# Altium PCB VCB2025_rev0.PcbDoc (part 3 of 3)
Units mm, origin at the board's own origin, x right, y up, seen from the top; angles counter-clockwise.
Board outline 146 x 96 mm, 2 copper layers (Top Layer, Bottom Layer); 173 components, 126 nets, 592 pads, 876 vias.
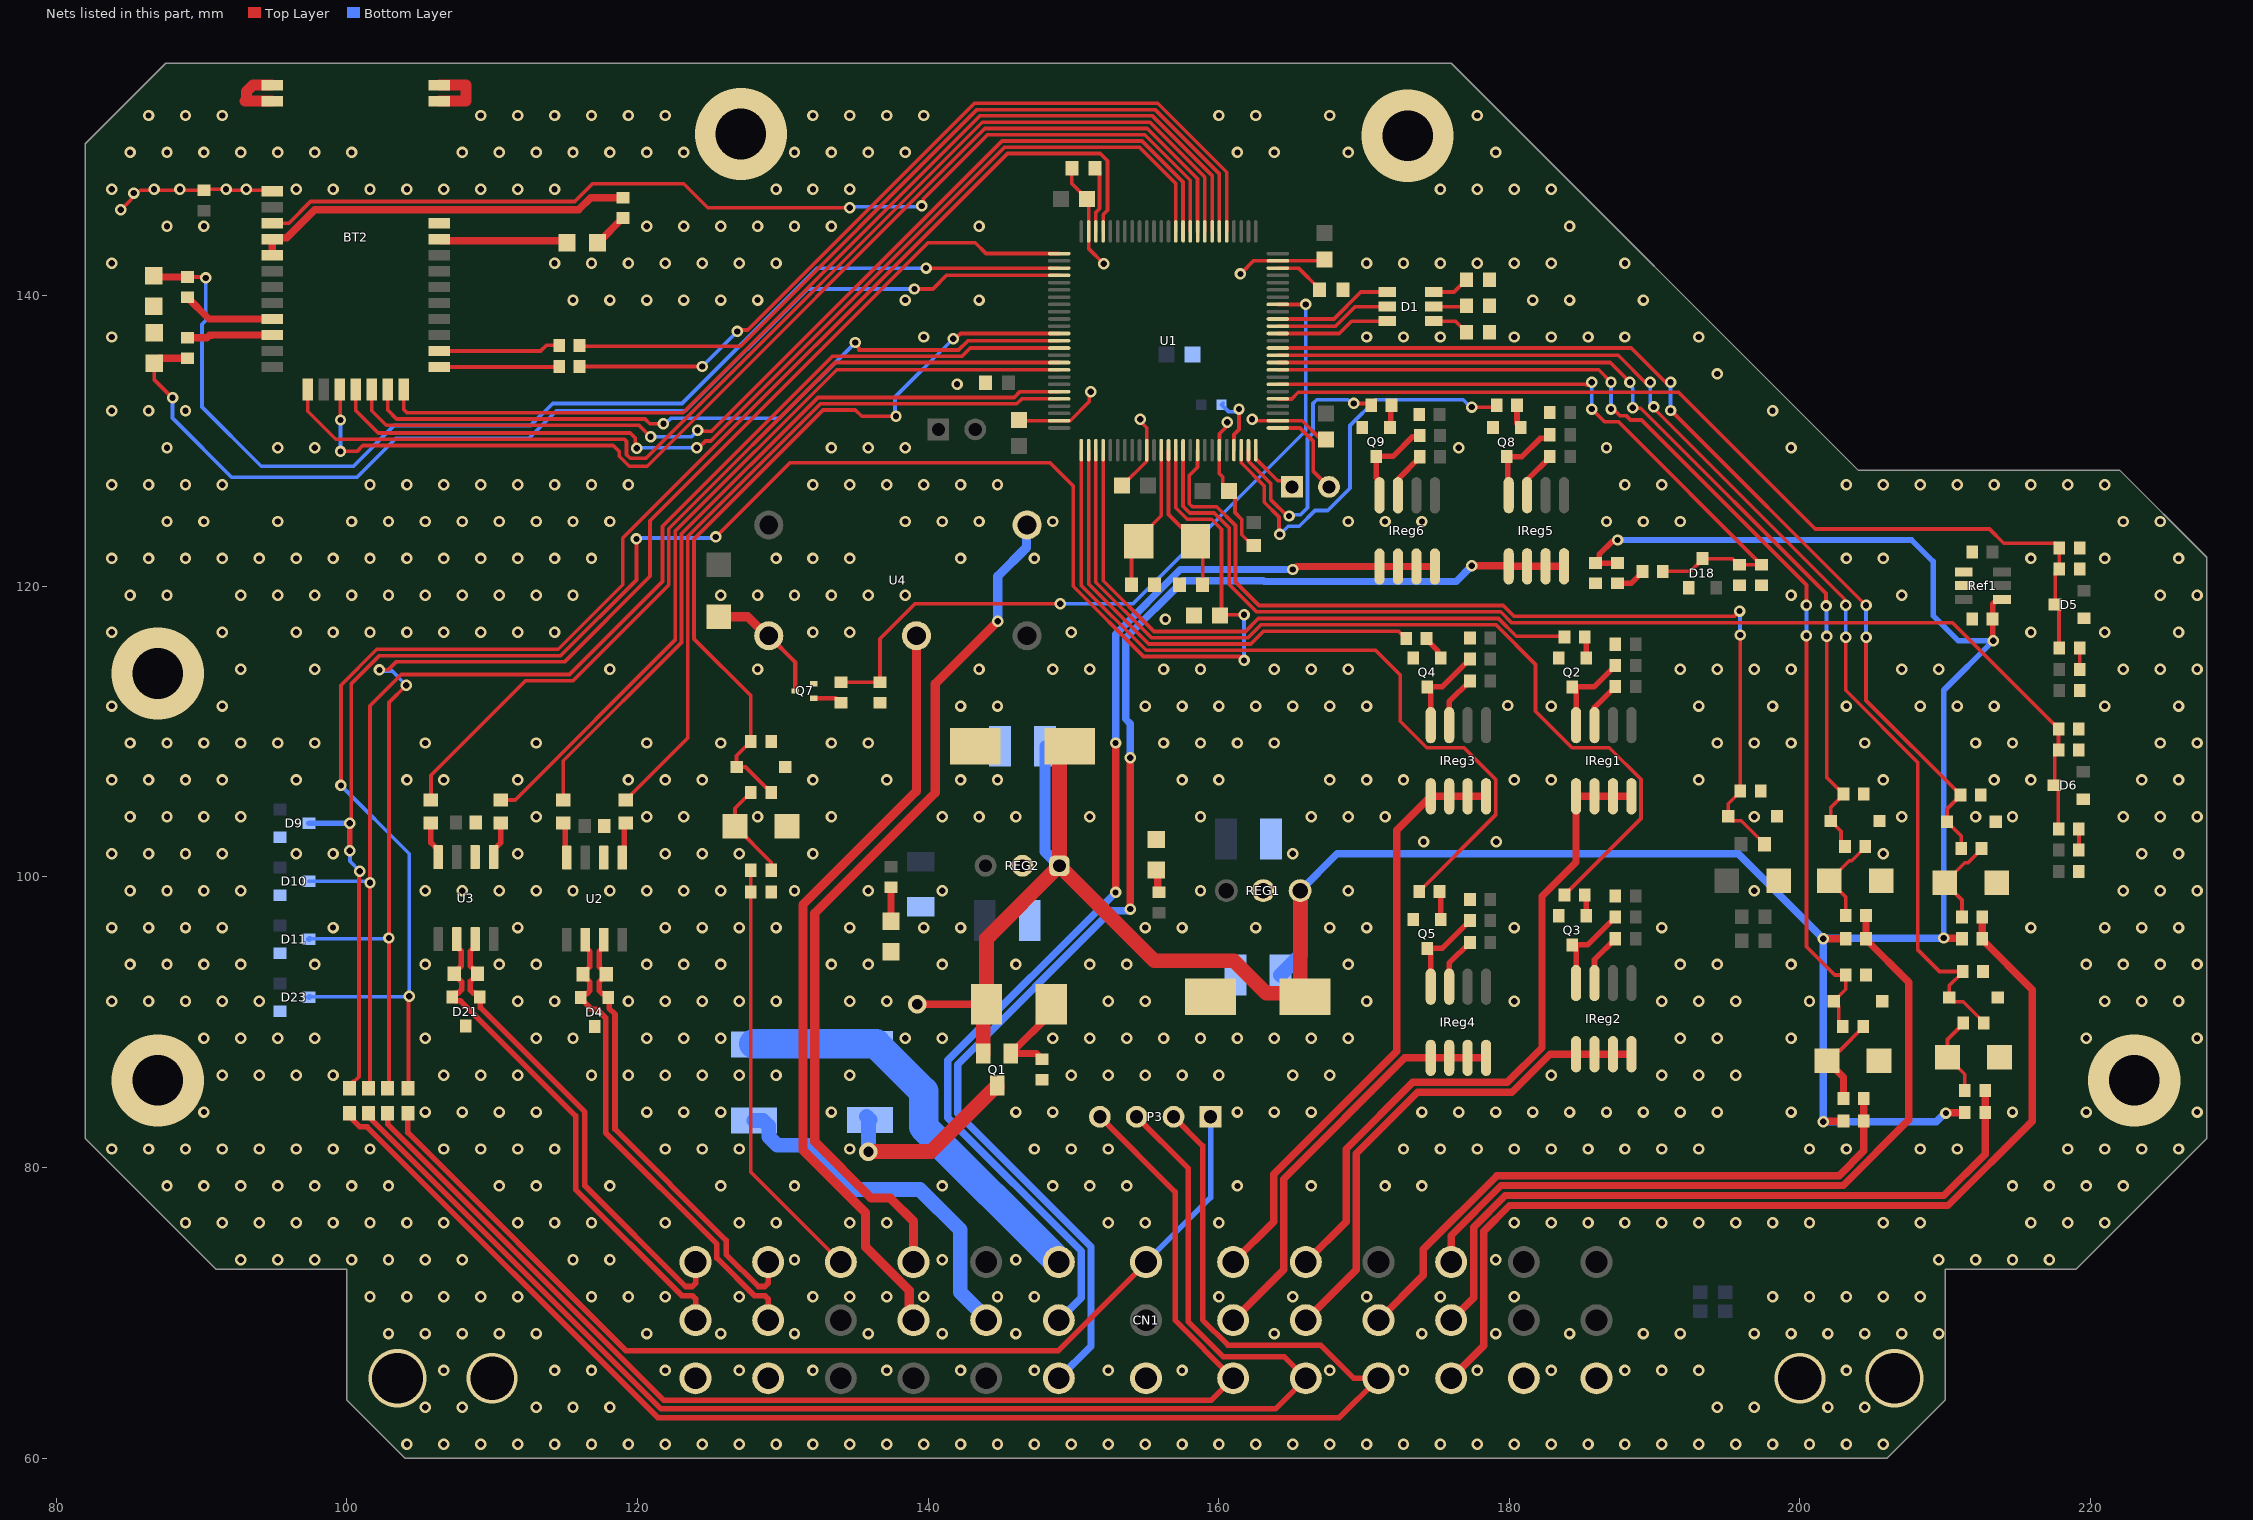
[diagram p2: the nets of this part, all layers, seen from the top]

## Via types
v1: diameter 0.787, hole 0.432, Top Layer to Bottom Layer, 855 vias
v2: diameter 1.27, hole 0.711, Top Layer to Bottom Layer, 10 vias
v3: diameter 6.35, hole 3.48, Top Layer to Bottom Layer, 5 vias
v4: diameter 4, hole 3.5, Top Layer to Bottom Layer, 2 vias
v5: diameter 3.5, hole 3, Top Layer to Bottom Layer, 2 vias
v6: diameter 1.5, hole 1, Top Layer to Bottom Layer, 2 vias

## Nets (pads, with @x,y where several pads share a name; then routed paths per layer and width w, separated by ;. In a path a pad name is that pad's centre, name@x,y a point inside that pad or via, vN(x,y) a via of type N, cw(c..) or ccw(c..) an arc to the next point about the centre after c; other vN are vias at no path point) (continued)
"BT EAN": BT2.20 U1.88 | length 51
  Top Layer w0.254: BT2.20@102.819,133.542 102.819,132.131 103.429,131.521 120.523,131.521 120.853,131.191 v1(121.793,131.191) ; v1(135.001,136.779) 135.001,136.635 135.255,136.381 135.255,136.264 142.106,136.264 142.742,136.9 U1.88@149.025,136.9
  Bottom Layer w0.254: v1(121.793,131.191) 121.937,131.191 122.318,131.572 125.349,131.572 129.794,131.572 v1(135.001,136.779)
"BT NCTS": BT2.15 U1.58 | length 80
  Top Layer w0.254: BT2.15@97.32,133.542 97.32,132.042 99.238,130.124 119.104,130.124 119.253,129.975 119.253,129.06 119.507,128.806 120.596,128.806 143.732,151.943 155.268,151.943 159.05,148.161 U1.58@159.05,144.425
"BT NRTS": BT2.17 U1.59 | length 78.9
  Top Layer w0.254: BT2.17@99.52,133.542 99.544,133.518 99.544,131.469 v1(99.568,131.445) ; v1(99.568,129.286) 100.698,129.286 101.105,129.692 103.505,129.692 118.339,129.692 118.745,129.286 118.745,128.958 119.433,128.27 120.67,128.27 143.911,151.511 155.089,151.511 158.55,148.05 U1.59@158.55,144.425
  Bottom Layer w0.254: v1(99.568,129.286) v1(99.568,131.445)
"BT P2_0": BT2.18 U1.62 | length 72.2
  Top Layer w0.254: BT2.18@100.62,133.542 100.62,132.102 102.165,130.556 119.507,130.556 119.85,130.213 119.85,129.607 v1(119.952,129.505) ; v1(124.079,129.54) 124.223,129.54 124.685,130.001 125.048,130.001 145.263,150.216 154.552,150.216 157.05,147.718 U1.62@157.05,144.425
  Bottom Layer w0.254: v1(119.952,129.505) 119.974,129.527 124.066,129.527 v1(124.079,129.54)
"BT P2_4": BT2.19 U1.61 | length 71.1
  Top Layer w0.254: BT2.19@101.719,133.542 101.719,132.088 102.718,131.089 120.117,131.089 v1(120.904,130.302) ; v1(124.138,130.751) 124.206,130.683 125.119,130.683 145.084,150.647 154.731,150.647 157.55,147.829 U1.61@157.55,144.425
  Bottom Layer w0.254: v1(120.904,130.302) 123.723,130.302 124.138,130.717 v1(124.138,130.751)
"BT Reset": BT2.21 U1.57 | length 71.1
  Top Layer w0.254: BT2.21@103.919,133.542 103.919,132.174 104.14,131.953 123.132,131.953 143.553,152.375 155.447,152.375 159.55,148.271 U1.57@159.55,144.425
"BT Rx": BT2.22 R33.1 | length 8.3
  Top Layer w0.254: BT2.22@106.37,135.095 114.583,135.095 R33.1@114.616,135.128
"BT Tx": BT2.23 R32.1 | length 8.4
  Top Layer w0.254: BT2.23@106.37,136.195 113.335,136.195 113.722,136.582 R32.1@114.616,136.582
"CAN Rx": R9.2 U1.95 | length 51.7
  Top Layer w0.254: R9.2@114.9,105.3 114.9,108 123.036,116.136 123.036,123.615 132.421,133 145.931,133 146.331,133.4 U1.95@149.025,133.4
"CAN Tx": R10.2 U1.96 | length 49.4
  Top Layer w0.254: R10.2@119.209,105.3 119.259,105.3 119.582,105.623 119.582,105.673 123.468,109.56 123.468,123.437 132.6,132.568 146.11,132.568 146.442,132.9 U1.96@149.025,132.9
CAN_N: CN1.35 D4.2 R11.1 U2.6 | length 33.1
  Top Layer w0.381: U2.6@116.419,95.679 116.419,95.179 116.737,94.862 116.737,93.832 116.254,93.35 R11.1@116.254,93.3 116.254,93.25 116.737,92.767 116.737,92.178 116.514,91.955 116.314,91.955 116.104,91.746 116.104,91.646 116.855,90.895 117.226,90.895 117.823,90.298 117.823,82.379 125.468,74.734 125.468,73.77 128.056,71.183 128.777,71.183 129,70.959 CN1.35@129,69.5
CAN_P: CN1.34 D4.1 R11.2 U2.7 | length 31.4
  Top Layer w0.381: U2.7@117.772,95.597 U2.7@117.689,95.679 117.689,95.179 117.372,94.862 117.372,93.832 117.854,93.35 R11.2@117.854,93.3 117.854,93.25 117.372,92.768 117.372,92.178 117.595,91.955 117.795,91.955 118.004,91.746 D4.1@118.004,91.696 118.056,91.644 118.056,90.963 118.458,90.561 118.458,82.642 126.103,74.997 126.103,74.033 128.319,71.818 128.777,71.818 129,72.041 CN1.34@129,73.5
"Debug LED B": D1.6 U1.39 | length 7.9
  Top Layer w0.254: U1.39@164.075,137.4 168.3,137.4 169.15,138.25 D1.6@171.6,138.25
"Debug LED G": D1.5 U1.40 | length 8.1
  Top Layer w0.254: U1.40@164.075,137.9 168.042,137.9 169.392,139.25 D1.5@171.6,139.25
"Debug LED R": D1.4 U1.41 | length 8.3
  Top Layer w0.254: U1.41@164.075,138.4 167.931,138.4 169.781,140.25 D1.4@171.6,140.25
"GLV Power In": CN1.22 F8.1 F12.1 | length 28.6
  Bottom Layer w2.032: F12.1@128.016,88.515 132.08,88.515 F8.1@136,88.515 136.433,88.515 139.7,85.248 139.7,82.8 CN1.22@149,73.5
GND: BT2.1 BT2.2 BT2.3 BT2.31 BT2.32 BT2.33 C1.1 C2.1 C3.1 C4.1 C5.1 C6.1 C7.1 C8.1 C9.1 C10.1 C11.1 C12.2 C13.1 C14.1 C15.1 C16.2 C17.1 C18.1 C19.1 C20.1 C21.1 C22.1 C23.1 C24.1 C25.1 C26.1 C27.1 C28.1 C30.1 C31.1 C32.1 C33.1 C34.1 C35.1 C36.1 C37.1 C38.1 C39.1 C40.1 CN1.3 CN1.6 CN1.21 CN1.36 CN1.39 D3.1 D4.3 D5.1 D6.1 D7.1 D8.1 D9.1 D10.1 D11.1 D12.1 D13.1 D14.1 D15.1 D16.1 D17.1 D18.1 D19.1 D20.1 D21.3 D22.1 D23.1 DS1.2 DS2.2 DS4.2 DS5.2 Q2.2 Q3.2 Q4.2 Q5.2 Q7.2 Q8.2 Q9.2 R1.2 R2.2 R3.2 R4.2 R5.1 R8.1 R14.1 R15.1 R18.1 R19.1 R42.1 R45.1 R46.1 R62.1 Ref1.1 Ref1.2 REG1.2 REG2.2 U1.10 U1.20 U1.27 U1.49 U1.74 U1.99 U2.2 U3.2 | length 61.1
  Top Layer w0.254: v1(84.455,145.923) 85.79,147.258 C28.1@90.17,147.258 90.232,147.32 v1(91.694,147.32) 91.757,147.256 94.805,147.256 BT2.3@94.869,147.193 ; C9.1@146.25,131.45 146.3,131.4 U1.99@149.025,131.4 149.027,131.402 149.785,131.402 151.098,132.715 151.098,133.298 v1(151.2,133.4) ; C2.1@149.9,148.759 149.9,147.704 C25.1@150.95,146.654 151.05,146.554 U1.74@151.05,144.425 151.05,143.25 v1(152.1,142.2) ; C6.1@153.35,126.95 153.383,126.95 155.048,128.615 155.048,129.373 U1.10@155.05,129.375 155.05,130.906 154.6,131.356 v1(154.6,131.5) ; v1(160.6,131.3) 160.6,131.056 160.052,130.508 160.052,129.377 U1.20@160.05,129.375 160.05,127.75 160.277,127.523 160.277,126.973 C7.1@160.7,126.55 161.123,126.127 161.123,125.077 161.595,124.605 161.595,123.555 162.35,122.8 C3.1@162.4,122.8 ; v1(161.5,141.5) 162.4,142.4 U1.49@164.075,142.4 167.196,142.4 C23.1@167.3,142.504 ; v1(162.3,131.5) 162.398,131.402 164.073,131.402 U1.27@164.075,131.4 165.75,131.4 167.05,130.1 C8.1@167.4,130.1
  Top Layer w0.381: C36.1@177.277,116.477 C36.1@177.3,116.454
  Top Layer w0.762: BT2.2@94.869,153.393 92.987,153.393 93.091,153.497 93.091,154.047 93.537,154.493 BT2.1@94.869,154.493 ; BT2.32@106.37,153.393 108.181,153.393 108.204,153.416 108.204,154.493 BT2.33@106.37,154.493
  other v1: 104.14,60.96 106.68,60.96 109.22,60.96 111.76,60.96 114.3,60.96 116.84,60.96 119.38,60.96 121.92,60.96 124.46,60.96 127,60.96 129.54,60.96 132.08,60.96 134.62,60.96 137.16,60.96 139.7,60.96 142.24,60.96 144.78,60.96 147.32,60.96 149.86,60.96 152.4,60.96 154.94,60.96 157.48,60.96 160.02,60.96 162.56,60.96 165.1,60.96 167.64,60.96 170.18,60.96 172.72,60.96 175.26,60.96 177.8,60.96 180.34,60.96 182.88,60.96 185.42,60.96 187.96,60.96 190.5,60.96 193.04,60.96 195.58,60.96 198.12,60.96 200.66,60.96 203.2,60.96 205.74,60.96 105.41,63.5 107.95,63.5 113.03,63.5 115.57,63.5 118.11,63.5 194.31,63.5 196.85,63.5 201.93,63.5 204.47,63.5 106.68,66.04 114.3,66.04 116.84,66.04 121.92,66.04 127,66.04 132.08,66.04 137.16,66.04 142.24,66.04 147.32,66.04 152.4,66.04 157.48,66.04 167.64,66.04 172.72,66.04 177.8,66.04 182.88,66.04 187.96,66.04 190.5,66.04 193.04,66.04 203.2,66.04 102.87,68.58 105.41,68.58 107.95,68.58 110.49,68.58 113.03,68.58 120.65,68.58 125.73,68.58 130.81,68.58 135.89,68.58 140.97,68.58 146.05,68.58 163.83,68.58 173.99,68.58 179.07,68.58 184.15,68.58 189.23,68.58 191.77,68.58 196.85,68.58 199.39,68.58 201.93,68.58 204.47,68.58 207.01,68.58 209.55,68.58 101.6,71.12 104.14,71.12 106.68,71.12 109.22,71.12 111.76,71.12 116.84,71.12 119.38,71.12 121.92,71.12 127,71.12 132.08,71.12 134.62,71.12 137.16,71.12 139.7,71.12 144.78,71.12 147.32,71.12 160.02,71.12 165.1,71.12 170.18,71.12 175.26,71.12 180.34,71.12 198.12,71.12 200.66,71.12 203.2,71.12 205.74,71.12 208.28,71.12 92.71,73.66 95.25,73.66 97.79,73.66 100.33,73.66 102.87,73.66 105.41,73.66 107.95,73.66 115.57,73.66 118.11,73.66 130.81,73.66 140.97,73.66 146.05,73.66 179.07,73.66 209.55,73.66 212.09,73.66 214.63,73.66 217.17,73.66 88.9,76.2 91.44,76.2 93.98,76.2 96.52,76.2 99.06,76.2 101.6,76.2 104.14,76.2 106.68,76.2 111.76,76.2 114.3,76.2 116.84,76.2 121.92,76.2 127,76.2 129.54,76.2 134.62,76.2 137.16,76.2 152.4,76.2 154.94,76.2 160.02,76.2 180.34,76.2 182.88,76.2 185.42,76.2 187.96,76.2 190.5,76.2 193.04,76.2 195.58,76.2 198.12,76.2 200.66,76.2 205.74,76.2 208.28,76.2 215.9,76.2 218.44,76.2 220.98,76.2 87.63,78.74 90.17,78.74 92.71,78.74 95.25,78.74 97.79,78.74 100.33,78.74 102.87,78.74 110.49,78.74 113.03,78.74 118.11,78.74 125.73,78.74 130.81,78.74 140.97,78.74 148.59,78.74 151.13,78.74 153.67,78.74 161.29,78.74 166.37,78.74 171.45,78.74 173.99,78.74 214.63,78.74 217.17,78.74 219.71,78.74 222.25,78.74 83.82,81.28 86.36,81.28 88.9,81.28 91.44,81.28 93.98,81.28 96.52,81.28 99.06,81.28 101.6,81.28 106.68,81.28 109.22,81.28 111.76,81.28 114.3,81.28 121.92,81.28 124.46,81.28 127,81.28 134.62,81.28 147.32,81.28 149.86,81.28 152.4,81.28 172.72,81.28 175.26,81.28 177.8,81.28 180.34,81.28 182.88,81.28 185.42,81.28 187.96,81.28 190.5,81.28 193.04,81.28 200.66,81.28 203.2,81.28 208.28,81.28 210.82,81.28 218.44,81.28 220.98,81.28 223.52,81.28 226.06,81.28 90.17,83.82 105.41,83.82 107.95,83.82 110.49,83.82 113.03,83.82 120.65,83.82 123.19,83.82 125.73,83.82 133.35,83.82 146.05,83.82 148.59,83.82 161.29,83.82 163.83,83.82 166.37,83.82 173.99,83.82 176.53,83.82 179.07,83.82 181.61,83.82 184.15,83.82 186.69,83.82 189.23,83.82 191.77,83.82 194.31,83.82 199.39,83.82 214.63,83.82 219.71,83.82 227.33,83.82 91.44,86.36 93.98,86.36 96.52,86.36 99.06,86.36 106.68,86.36 109.22,86.36 111.76,86.36 116.84,86.36 119.38,86.36 121.92,86.36 124.46,86.36 127,86.36 129.54,86.36 134.62,86.36 149.86,86.36 152.4,86.36 154.94,86.36 157.48,86.36 160.02,86.36 165.1,86.36 167.64,86.36 182.88,86.36 190.5,86.36 193.04,86.36 195.58,86.36 90.17,88.9 92.71,88.9 95.25,88.9 97.79,88.9 105.41,88.9 113.03,88.9 115.57,88.9 120.65,88.9 123.19,88.9 125.73,88.9 138.43,88.9 140.97,88.9 148.59,88.9 151.13,88.9 153.67,88.9 156.21,88.9 158.75,88.9 161.29,88.9 163.83,88.9 166.37,88.9 168.91,88.9 191.77,88.9 194.31,88.9 199.39,88.9 219.71,88.9 227.33,88.9 83.82,91.44 86.36,91.44 88.9,91.44 91.44,91.44 93.98,91.44 111.76,91.44 114.3,91.44 119.38,91.44 121.92,91.44 124.46,91.44 127,91.44 129.54,91.44 134.62,91.44 137.16,91.44 152.4,91.44 154.94,91.44 170.18,91.44 180.34,91.44 190.5,91.44 193.04,91.44 195.58,91.44 200.66,91.44 220.98,91.44 223.52,91.44 226.06,91.44 85.09,93.98 87.63,93.98 90.17,93.98 92.71,93.98 97.79,93.98 105.41,93.98 110.49,93.98 113.03,93.98 120.65,93.98 123.19,93.98 125.73,93.98 133.35,93.98 135.89,93.98 140.97,93.98 146.05,93.98 151.13,93.98 153.67,93.98 168.91,93.98 191.77,93.98 194.31,93.98 199.39,93.98 219.71,93.98 222.25,93.98 224.79,93.98 227.33,93.98 83.82,96.52 86.36,96.52 88.9,96.52 91.44,96.52 99.06,96.52 111.76,96.52 121.92,96.52 124.46,96.52 127,96.52 129.54,96.52 134.62,96.52 139.7,96.52 142.24,96.52 154.94,96.52 157.48,96.52 162.56,96.52 167.64,96.52 170.18,96.52 180.34,96.52 190.5,96.52 215.9,96.52 220.98,96.52 223.52,96.52 226.06,96.52 85.09,99.06 87.63,99.06 90.17,99.06 92.71,99.06 105.41,99.06 107.95,99.06 110.49,99.06 113.03,99.06 115.57,99.06 118.11,99.06 120.65,99.06 123.19,99.06 125.73,99.06 130.81,99.06 135.89,99.06 140.97,99.06 158.75,99.06 168.91,99.06 196.85,99.06 222.25,99.06 224.79,99.06 227.33,99.06 83.82,101.6 86.36,101.6 88.9,101.6 91.44,101.6 96.52,101.6 99.06,101.6 111.76,101.6 121.92,101.6 124.46,101.6 127,101.6 132.08,101.6 165.1,101.6 205.74,101.6 223.52,101.6 226.06,101.6 174.1,102.425 179.1,102.425 85.09,104.14 87.63,104.14 90.17,104.14 92.71,104.14 113.03,104.14 120.65,104.14 123.19,104.14 128.27,104.14 133.35,104.14 140.97,104.14 143.51,104.14 146.05,104.14 151.13,104.14 158.75,104.14 166.37,104.14 168.91,104.14 171.45,104.14 196.85,104.14 207.01,104.14 212.09,104.14 214.63,104.14 222.25,104.14 224.79,104.14 227.33,104.14 83.82,106.68 86.36,106.68 88.9,106.68 91.44,106.68 96.52,106.68 104.14,106.68 106.68,106.68 111.76,106.68 119.38,106.68 121.92,106.68 124.46,106.68 132.08,106.68 137.16,106.68 142.24,106.68 144.78,106.68 157.48,106.68 160.02,106.68 167.64,106.68 170.18,106.68 172.72,106.68 180.34,106.68 182.88,106.68 193.04,106.68 205.74,106.68 213.36,106.68 215.9,106.68 223.52,106.68 226.06,106.68 85.09,109.22 87.63,109.22 90.17,109.22 92.71,109.22 95.25,109.22 97.79,109.22 105.41,109.22 113.03,109.22 120.65,109.22 125.73,109.22 133.35,109.22 135.89,109.22 156.21,109.22 158.75,109.22 161.29,109.22 163.83,109.22 194.31,109.22 196.85,109.22 199.39,109.22 204.47,109.22 212.09,109.22 214.63,109.22 224.79,109.22 227.33,109.22 83.82,111.76 91.44,111.76 142.24,111.76 144.78,111.76 154.94,111.76 157.48,111.76 160.02,111.76 162.56,111.76 165.1,111.76 167.64,111.76 170.18,111.76 182.88,111.76 193.04,111.76 198.12,111.76 203.2,111.76 208.28,111.76 210.82,111.76 213.36,111.76 220.98,111.76 226.06,111.76 179.9,111.8 92.71,114.3 97.79,114.3 118.11,114.3 128.27,114.3 143.51,114.3 148.59,114.3 151.13,114.3 156.21,114.3 158.75,114.3 163.83,114.3 166.37,114.3 168.91,114.3 191.77,114.3 194.31,114.3 196.85,114.3 199.39,114.3 207.01,114.3 209.55,114.3 222.25,114.3 224.79,114.3 227.33,114.3 83.82,116.84 91.44,116.84 96.52,116.84 99.06,116.84 101.6,116.84 104.14,116.84 106.68,116.84 109.22,116.84 111.76,116.84 114.3,116.84 132.08,116.84 134.62,116.84 149.86,116.84 215.9,116.84 220.98,116.84 226.06,116.84 156.337,117.729 85.09,119.38 87.63,119.38 92.71,119.38 95.25,119.38 97.79,119.38 100.33,119.38 102.87,119.38 105.41,119.38 107.95,119.38 110.49,119.38 113.03,119.38 115.57,119.38 125.73,119.38 128.27,119.38 130.81,119.38 133.35,119.38 135.89,119.38 138.43,119.38 199.39,119.38 207.01,119.38 224.79,119.38 227.33,119.38 83.82,121.92 86.36,121.92 88.9,121.92 91.44,121.92 93.98,121.92 96.52,121.92 99.06,121.92 101.6,121.92 104.14,121.92 106.68,121.92 109.22,121.92 111.76,121.92 114.3,121.92 116.84,121.92 129.54,121.92 132.08,121.92 134.62,121.92 142.24,121.92 147.32,121.92 203.2,121.92 205.74,121.92 215.9,121.92 220.98,121.92 226.06,121.92 87.63,124.46 90.17,124.46 95.25,124.46 100.33,124.46 102.87,124.46 105.41,124.46 107.95,124.46 110.49,124.46 113.03,124.46 115.57,124.46 118.11,124.46 138.43,124.46 140.97,124.46 143.51,124.46 148.59,124.46 168.91,124.46 171.45,124.46 173.99,124.46 186.69,124.46 189.23,124.46 191.77,124.46 222.25,124.46 224.79,124.46 83.82,127 86.36,127 88.9,127 91.44,127 101.6,127 104.14,127 106.68,127 109.22,127 111.76,127 114.3,127 116.84,127 119.38,127 132.08,127 134.62,127 137.16,127 139.7,127 142.24,127 144.78,127 187.96,127 190.5,127 203.2,127 205.74,127 208.28,127 210.82,127 213.36,127 215.9,127 218.44,127 220.98,127 87.63,129.54 95.25,129.54 97.79,129.54 133.35,129.54 135.89,129.54 138.43,129.54 176.53,129.54 186.69,129.54 199.39,129.54 83.82,132.08 86.36,132.08 88.9,132.08 198.12,132.08 142,133.9 194.31,134.62 83.82,137.16 139.7,137.16 170.18,137.16 172.72,137.16 175.26,137.16 180.34,137.16 182.88,137.16 185.42,137.16 187.96,137.16 193.04,137.16 115.57,139.7 118.11,139.7 120.65,139.7 123.19,139.7 125.73,139.7 128.27,139.7 138.43,139.7 143.51,139.7 181.61,139.7 184.15,139.7 189.23,139.7 83.82,142.24 114.3,142.24 116.84,142.24 119.38,142.24 121.92,142.24 124.46,142.24 127,142.24 129.54,142.24 170.18,142.24 172.72,142.24 175.26,142.24 177.8,142.24 180.34,142.24 182.88,142.24 187.96,142.24 87.63,144.78 90.17,144.78 120.65,144.78 123.19,144.78 125.73,144.78 128.27,144.78 130.81,144.78 133.35,144.78 143.51,144.78 184.15,144.78 85.344,147.066 83.82,147.32 86.741,147.32 88.519,147.32 93.091,147.32 96.52,147.32 99.06,147.32 101.6,147.32 104.14,147.32 106.68,147.32 109.22,147.32 111.76,147.32 114.3,147.32 129.54,147.32 132.08,147.32 134.62,147.32 175.26,147.32 177.8,147.32 180.34,147.32 182.88,147.32 85.09,149.86 87.63,149.86 90.17,149.86 92.71,149.86 95.25,149.86 97.79,149.86 100.33,149.86 107.95,149.86 110.49,149.86 113.03,149.86 115.57,149.86 118.11,149.86 120.65,149.86 123.19,149.86 130.81,149.86 133.35,149.86 135.89,149.86 138.43,149.86 161.29,149.86 163.83,149.86 168.91,149.86 179.07,149.86 86.36,152.4 88.9,152.4 91.44,152.4 109.22,152.4 111.76,152.4 114.3,152.4 116.84,152.4 119.38,152.4 121.92,152.4 132.08,152.4 134.62,152.4 137.16,152.4 139.7,152.4 160.02,152.4 162.56,152.4 167.64,152.4 177.8,152.4
  other v3: 87,86 223,86 87,114 173,151 127.127,151.13
  other v4: 103.5,65.5 206.5,65.5
  other v5: 110,65.5 200,65.5
"Internal Connect": BT2.6 BT2.7 R69.1 | length 26.4
  Top Layer w0.508: BT2.7@94.869,142.794 BT2.6@94.869,143.894 94.971,143.995 95.862,143.995 97.79,145.923 115.951,145.923 116.778,146.75 R69.1@118.999,146.75
"Launch Control": CN1.9 R31.1 R34.1 | length 67.4
  Top Layer w0.508: CN1.9@176,65.5 178.236,67.736 178.236,75.616 180.012,77.393 210.193,77.393 216,83.2 216,92.25 212.55,95.7 R31.1@212.55,95.75 R34.1@212.55,97.25
"Launch Control Interm": D19.2 R34.2 R35.1 | length 6.4
  Top Layer w0.254: D19.2@209.96,99.6 D19.2@209.97,99.6 ; R34.2@211.15,97.25 211.15,98.42 D19.2@209.97,99.6 ; R35.1@212.5,101.95 212.5,101.9 211.57,100.97 211.34,100.97 D19.2@209.97,99.6
"LC LED": R65.2 U1.23 | length 28.5
  Top Layer w0.254: U1.23@161.55,129.375 161.552,129.373 161.552,128.505 163.144,126.912 163.144,125.781 164.147,124.777 164.147,123.634 v1(164.211,123.571) ; v1(177.419,132.334) 179.005,132.334 R65.2@179.132,132.461
  Bottom Layer w0.254: v1(164.211,123.571) 164.782,124.142 165.544,124.142 166.624,125.222 167.513,125.222 169.037,126.746 169.037,131.064 170.815,132.842 176.831,132.842 177.339,132.334 v1(177.419,132.334)
"LC LED Output": CN1.24 IReg5.5 IReg5.6 IReg5.7 IReg5.8 | length 93.7
  Top Layer w0.508: v1(153.924,97.79) v1(153.924,108.204) ; v1(177.419,121.412) 179.922,121.412 IReg5.5@179.959,121.375 IReg5.6@181.229,121.375 IReg5.7@182.499,121.375 IReg5.8@183.769,121.375
  Bottom Layer w0.508: CN1.24@149,65.5 151.218,67.718 151.218,74.542 142.037,83.723 142.037,87.092 152.608,97.663 153.721,97.663 153.848,97.79 v1(153.924,97.79) ; v1(153.924,108.204) 153.924,110.541 153.594,110.871 153.594,116.429 157.561,120.396 163.068,120.396 163.131,120.332 176.339,120.332 v1(177.419,121.412)
LED1: BT2.30 DS3.2 | length 8.9
  Top Layer w0.508: BT2.30@106.37,143.894 106.472,143.792 115,143.792 DS3.2@115.155,143.637
"LED IND1": BT2.11 R70.2 | length 6.5
  Top Layer w0.508: R70.2@89.027,139.889 90.522,138.394 BT2.11@94.869,138.394
"LED IND2": BT2.12 R71.2 | length 6.2
  Top Layer w0.254: 90.424,137.16 90.742,137.16
  Top Layer w0.508: R71.2@89.027,137.098 90.362,137.098 90.559,137.295 BT2.12@94.869,137.295
NetD1_1: D1.1 R3.1 | length 2.6
  Top Layer w0.254: D1.1@174.8,138.25 176.3,138.25 R3.1@177.05,137.5
NetD1_2: D1.2 R2.1 | length 2.3
  Top Layer w0.254: D1.2@174.8,139.25 176.996,139.25 R2.1@177.05,139.304
NetD1_3: D1.3 R1.1 | length 2.6
  Top Layer w0.254: D1.3@174.8,140.25 176.192,140.25 R1.1@177.05,141.109
NetD2_A: D2.A Q1.1 R5.2 | length 6.9
  Top Layer w0.508: R5.2@147.854,87.45 147.454,87.85 Q1.1@145.7,87.85 148.475,90.625 D2.A@148.475,91.25
NetD24_1: D24.1 Q7.3 U4.A1 | length 8.5
  Top Layer w0.305: U4.A1@129.04,116.6 130.852,114.788 Q7.3@130.852,112.8
  Top Layer w0.635: D24.1@125.6,117.91 127.584,117.91 128.894,116.6 U4.A1@129.04,116.6
NetDS1_1: DS1.1 R6.2 | length 1.6
  Top Layer w0.508: DS1.1@155.7,100.479 155.802,100.377 155.802,99.052 R6.2@155.904,98.95
NetDS2_1: DS2.1 R7.2 | length 2.3
  Top Layer w0.508: DS2.1@137.45,96.966 R7.2@137.45,99.3
NetDS3_1: DS3.1 R69.2 | length 2.5
  Top Layer w0.508: DS3.1@117.255,143.637 117.365,143.747 117.365,143.716 R69.2@118.999,145.35
NetIReg1_3: IReg1.3 R47.2 | length 3.2
  Top Layer w0.381: IReg1.3@185.865,110.45 185.865,111.669 R47.2@187.3,113.104
NetIReg1_4: IReg1.4 Q2.3 R48.2 | length 6.3
  Top Layer w0.381: IReg1.4@184.595,110.45 184.595,112.83 Q2.3@184.346,113.079 185.821,113.079 R48.2@187.3,114.559
NetIReg2_3: IReg2.3 R50.2 | length 3.6
  Top Layer w0.381: IReg2.3@185.865,92.7 185.865,94.315 R50.2@187.3,95.75
NetIReg2_4: IReg2.4 Q3.3 R51.2 | length 6.5
  Top Layer w0.381: IReg2.4@184.595,92.7 184.595,95.08 Q3.3@184.346,95.329 185.379,95.329 R51.2@187.3,97.25
NetIReg3_3: IReg3.3 R53.2 | length 3.6
  Top Layer w0.381: IReg3.3@175.865,110.45 175.865,112.065 R53.2@177.3,113.5
NetIReg3_4: IReg3.4 Q4.3 R54.2 | length 6.5
  Top Layer w0.381: IReg3.4@174.595,110.45 174.595,112.83 Q4.3@174.346,113.079 175.379,113.079 R54.2@177.3,115
NetIReg4_3: IReg4.3 R56.2 | length 3.6
  Top Layer w0.381: IReg4.3@175.865,92.45 175.865,94.065 R56.2@177.3,95.5
NetIReg4_4: IReg4.4 Q5.3 R57.2 | length 6.5
  Top Layer w0.381: IReg4.4@174.595,92.45 174.595,94.83 Q5.3@174.346,95.079 175.379,95.079 R57.2@177.3,97
NetIReg5_3: IReg5.3 R63.2 | length 3.3
  Top Layer w0.381: IReg5.3@181.229,126.275 181.29,126.336 181.29,127.383 182.786,128.879 R63.2@182.786,128.929
NetIReg5_4: IReg5.4 Q8.3 R64.2 | length 6.3
  Top Layer w0.381: Q8.3@179.832,128.921 Q8.3@179.848,128.905 ; IReg5.4@179.959,126.275 179.898,126.336 179.898,128.855 Q8.3@179.848,128.905 ; R64.2@182.786,130.429 182.786,130.398 182.577,130.188 182.131,130.188 180.848,128.905 Q8.3@179.848,128.905
NetIReg6_3: IReg6.3 R66.2 | length 3.3
  Top Layer w0.381: IReg6.3@172.339,126.263 172.4,126.324 172.4,127.437 173.83,128.867 R66.2@173.83,128.917
NetIReg6_4: IReg6.4 Q9.3 R67.2 | length 6.3
  Top Layer w0.381: IReg6.4@171.069,126.263 171.069,127.25 170.844,127.475 Q9.3@170.844,128.937 171.99,128.937 173.355,130.302 173.761,130.302 R67.2@173.83,130.372
NetL1_2: L1.2 U1.22 | length 4.6
  Top Layer w0.254: U1.22@161.05,129.375 161.05,130.45 161.4,130.8 v1(161.4,132.2)
  Bottom Layer w0.254: L1.2@160.3,132.6 L1.2@160.2,132.5 160.677,132.023 161.223,132.023 v1(161.4,132.2)
NetQ2_1: Q2.1 R49.1 | length 1.5
  Top Layer w0.381: R49.1@185.2,116.509 185.296,116.413 Q2.1@185.296,115.079
NetQ3_1: Q3.1 R52.1 | length 1.5
  Top Layer w0.381: R52.1@185.2,98.759 185.296,98.663 Q3.1@185.296,97.329
NetQ4_1: Q4.1 R55.1 | length 1.7
  Top Layer w0.381: R55.1@174.3,116.4 174.3,116.35 175.086,115.564 175.086,115.289 Q4.1@175.296,115.079
NetQ5_1: Q5.1 R58.1 | length 2
  Top Layer w0.381: R58.1@175.2,99 175.296,98.904 Q5.1@175.296,97.079
NetQ7_1: Q7.1 R61.1 | length 2
  Top Layer w0.305: Q7.1@132.148,112.3 133.65,112.3 133.95,112 R61.1@134,112
NetQ8_1: Q8.1 R65.1 | length 1.6
  Top Layer w0.381: R65.1@180.532,132.461 180.532,131.221 180.782,130.971 Q8.1@180.782,130.921
NetQ9_1: Q9.1 R68.1 | length 1.6
  Top Layer w0.381: Q9.1@171.794,130.937 171.845,130.988 171.845,132.41 R68.1@171.896,132.461
NetR9_1: R9.1 U2.4 | length 2.5
  Top Layer w0.381: R9.1@114.9,103.7 115.025,103.575 115.025,101.454 U2.4@115.149,101.329
NetR10_1: R10.1 U2.1 | length 2.5
  Top Layer w0.381: U2.1@118.959,101.329 119.084,101.454 119.084,103.575 R10.1@119.209,103.7
NetR12_2: R12.2 R13.1 | length 1.5
  Top Layer w0.254: R12.2@219.25,114.291 R13.1@219.25,115.746
NetR16_2: R16.2 R17.1 | length 1.5
  Top Layer w0.254: R16.2@219.2,101.841 R17.1@219.2,103.296
NetR28_1: R28.1 U3.4 | length 2.5
  Top Layer w0.381: R28.1@105.791,103.7 105.791,102.37 106.291,101.871 U3.4@106.291,101.371
NetR29_1: R29.1 U3.1 | length 2.5
  Top Layer w0.381: U3.1@110.101,101.371 110.101,101.871 110.6,102.37 R29.1@110.6,103.7
NetR43_2: R43.2 R44.1 | length 2.1
  Top Layer w0.381: R43.2@187.452,120.204 188.388,120.204 189.165,120.981 R44.1@189.165,121.031
NRST: C1.2 D9.3 F5.1 U1.14 | length 128.8
  Top Layer w0.254: v1(100.2,103.7) 100.299,103.799 100.299,113.286 102.244,115.232 114.732,115.232 119.935,120.435 v1(119.935,123.265) ; F5.1@100.453,85.874 100.838,86.259 v1@100.838,100.338 ; v1(125.399,123.399) 130.5,128.5 148.4,128.5 150,126.9 150,120 154.833,115.167 161.483,115.167 v1(161.75,114.9) ; U1.14@157.05,129.375 157.05,125.4 157.837,124.613 159.518,124.613 160.2,123.931 160.2,118.096 C1.2@160.154,118.05 ; C1.2@160.1,117.996 C1.2@160.154,118.05 ; v1(161.75,118.05) C1.2@160.154,118.05
  Top Layer w0.381: F5.1@100.193,85.45 100.453,85.71 F5.1@100.453,85.874 ; v1(100.2,101.8) v1(100.2,103.7) ; v1@100.838,100.338 v1(100.9,100.4)
  Bottom Layer w0.254: v1@100.217,101.783 100.217,101.083 v1(100.9,100.4) ; v1(119.935,123.265) 120.002,123.332 125.332,123.332 v1(125.399,123.399) ; v1(161.75,114.9) v1(161.75,118.05)
  Bottom Layer w0.381: D9.3@97.4,103.689 97.405,103.695 100.195,103.695 v1(100.2,103.7) ; v1(100.2,101.8) v1@100.217,101.783
"NRST F": CN1.12 F5.2 P3.2 | length 109.3
  Top Layer w0.381: F5.2@100.193,83.75 100.193,83.507 100.9,82.8 101.4,82.8 121.4,62.8 168.3,62.8 CN1.12@171,65.5 169.3,65.5 167.014,67.786 160.638,67.786 158.9,69.524 158.9,81.5 P3.2@156.9,83.5
P0_4: DS4.1 R70.1 U1.78 | length 79.2
  Top Layer w0.254: R70.1@89.027,141.289 v1@90.232,141.289 ; v1(139.868,141.9) U1.78@149.025,141.9
  Top Layer w0.508: DS4.1@86.935,141.162 DS4.1@86.712,141.385 86.808,141.289 R70.1@89.027,141.289
  Bottom Layer w0.254: v1(90.297,141.224) 90.297,138.294 90.043,138.04 90.043,132.334 94.107,128.27 97.917,128.27 100.457,128.27 103.251,131.064 112.649,131.064 114.173,132.588 123.063,132.588 132.375,141.9 132.629,141.9 v1(139.868,141.9)
P1_5: DS5.1 R71.1 U1.79 | length 75.7
  Top Layer w0.254: DS5.1@86.741,135.348 86.741,134.239 v1(88.011,132.969) ; v1(139.065,140.462) 140.335,140.462 141.273,141.4 U1.79@149.025,141.4
  Top Layer w0.508: R71.1@89.027,135.698 DS5.1@87.091,135.698 ; DS5.1@87.091,135.698 DS5.1@86.741,135.348 DS5.1@87.091,135.698
  Bottom Layer w0.254: v1(88.011,132.969) 88.011,131.572 88.138,131.445 92.075,127.508 92.583,127.508 94.488,127.508 100.711,127.508 103.378,130.175 112.522,130.175 114.427,132.08 123.317,132.08 131.699,140.462 132.08,140.462 v1(139.065,140.462)
"Ph0 OSC In": C4.2 U1.12 X1.2 | length 10.1
  Top Layer w0.254: C4.2@153.996,120.1 153.996,122.596 X1.2@154.5,123.1 154.5,123.3 156.05,124.85 U1.12@156.05,129.375
"Ph1 OSC Out": C10.2 U1.13 X1.1 | length 10.2
  Top Layer w0.254: U1.13@156.55,129.375 156.55,124.95 X1.1@158.4,123.1 158.9,122.6 C10.2@158.9,120.1
"RTD BTN": CN1.8 R22.1 R23.1 | length 48.7
  Top Layer w0.508: CN1.8@176,69.5 177.55,71.05 177.55,75.9 179.728,78.078 209.909,78.078 212.75,80.92 R22.1@212.75,83.8 R23.1@212.75,85.3
"RTD LED 1": R52.2 U1.3 | length 65
  Top Layer w0.254: U1.3@151.55,129.375 151.55,120.282 155.37,116.462 162.023,116.462 162.911,117.35 179.085,117.35 181.809,114.627 181.809,111.41 184.324,108.895 186.886,108.895 189.06,106.721 189.06,104.018 R52.2@183.8,98.759
"RTD LED 1 Output": CN1.14 IReg2.5 IReg2.6 IReg2.7 IReg2.8 | length 34.7
  Top Layer w0.508: CN1.14@166,69.5 169.468,72.968 169.468,80.968 173.682,85.182 180.182,85.182 182.8,87.8 IReg2.5@184.595,87.8 IReg2.6@185.865,87.8 IReg2.7@187.135,87.8 IReg2.8@188.405,87.8
"RTD LED 2": R58.2 U1.1 | length 55.1
  Top Layer w0.254: U1.1@150.55,129.375 150.55,120.061 155.012,115.598 170.802,115.598 172.5,113.9 172.5,110.719 174.324,108.895 176.886,108.895 179.06,106.721 179.06,104.26 R58.2@173.8,99
"RTD LED 2 Output": CN1.17 IReg4.5 IReg4.6 IReg4.7 IReg4.8 | length 28.5
  Top Layer w0.508: CN1.17@161,69.5 164.468,72.968 164.468,79.218 172.8,87.55 IReg4.5@174.595,87.55 IReg4.6@175.865,87.55 IReg4.7@177.135,87.55 IReg4.8@178.405,87.55
RTD_BTN_Interm: D12.2 R23.2 R24.1 | length 5.6
  Top Layer w0.254: R24.1@211.25,89.95 211.25,89.9 210.574,89.224 210.563,89.224 210.16,88.821 D12.2@210.16,87.6 210.17,87.6 211.35,86.42 R23.2@211.35,85.3
"SB Power": CN1.26 F12.2 | length 24.7
  Bottom Layer w1.016: F12.2@128.016,83.237 128.65,83.237 129.032,82.855 129.032,82.129 129.627,81.534 131.826,81.534 134.874,78.486 139.446,78.486 142.214,75.718 142.214,71.425 144,69.639 CN1.26@144,69.5
"Sensor CAN Rx": R28.2 U1.91 | length 59
  Top Layer w0.254: R28.2@105.791,105.3 105.791,106.991 112.3,113.5 115.563,113.5 122.163,120.1 122.163,123.963 133.6,135.4 U1.91@149.025,135.4
"Sensor CAN Tx": R29.2 U1.92 | length 55.1
  Top Layer w0.254: R29.2@110.6,105.3 111.589,105.3 122.595,116.305 122.595,123.784 133.71,134.9 U1.92@149.025,134.9
Sensor_CAN_N: CN1.38 D21.2 R30.1 U3.6 | length 34.7
  Top Layer w0.381: U3.6@107.561,95.721 107.561,95.221 107.878,94.903 107.878,93.874 107.396,93.391 R30.1@107.396,93.341 107.396,93.291 107.9,92.787 107.9,92.242 107.655,91.997 107.455,91.997 107.246,91.787 107.246,91.687 107.455,91.478 107.826,91.478 115.749,83.555 115.749,78.489 123.056,71.183 123.777,71.183 124,70.959 CN1.38@124,69.5
Sensor_CAN_P: CN1.37 D21.1 R30.2 U3.7 | length 32.9
  Top Layer w0.381: U3.7@108.831,95.721 108.831,95.221 108.513,94.903 108.513,93.874 108.996,93.391 R30.2@108.996,93.341 108.996,93.291 108.513,92.809 108.513,92.22 108.736,91.997 108.936,91.997 109.146,91.787 D21.1@109.146,91.737 109.198,91.685 109.198,91.004 116.384,83.818 116.384,78.752 123.319,71.818 123.777,71.818 124,72.041 CN1.37@124,73.5
"Serial Rx": P2.2 U1.26 | length 6.4
  Top Layer w0.254: U1.26@164.075,130.9 165.6,130.9 166.5,130 166.5,127.94 P2.2@167.59,126.85
"Serial Tx": P2.1 U1.25 | length 3.9
  Top Layer w0.254: U1.25@162.55,129.375 162.55,128.729 162.552,128.727 162.611,128.727 164.068,127.27 164.63,127.27 P2.1@165.05,126.85
"Shutdown Circuit In": CN1.28 U4.12 | length 60.4
  Top Layer w0.635: CN1.28@139,73.5 139,76.3 137.4,77.9 136.1,77.9 132.2,81.8 132.2,97.5 140.5,105.8 140.5,113.3 v1(144.8,117.6)
  Bottom Layer w0.635: v1(144.8,117.6) 144.8,120.7 146.772,122.672 146.772,124.172 U4.12@146.82,124.22
"Shutdown Circuit Out": CN1.29 U4.11 | length 53.5
  Top Layer w0.635: CN1.29@139,69.5 138.701,69.799 138.701,71.543 135.7,74.544 135.7,76.9 131.387,81.213 131.387,98.087 139.2,105.9 U4.11@139.2,116.6
"Shutdown Control": R61.2 R62.2 U1.43 | length 51.5
  Top Layer w0.254: R61.2@134,113.4 R62.2@136.7,113.4 136.7,115.7 136.7,116.4 139.1,118.8 v1(149.1,118.8) ; U1.43@164.075,139.4 165.9,139.4 v1(166,139.4)
  Bottom Layer w0.254: v1(149.1,118.8) 154.1,118.8 166,130.7 v1(166,139.4)
"Shutdown Tap": CN1.31 R40.2 R42.2 | length 29.5
  Top Layer w0.254: R40.2@127.8,100.463 R42.2@127.8,98.963 127.8,79.7 CN1.31@134,73.5
"Shutdown Tap Interm": D17.2 R40.1 R41.2 | length 6.8
  Top Layer w0.254: R41.2@127.8,105.812 126.71,104.722 D17.2@126.71,103.5 129.2,101.01 R40.1@129.2,100.463
SWDIO: D23.3 F3.1 U1.72 | length 111.6
  Top Layer w0.254: v1(99.6,106.3) 99.6,113.198 102.065,115.664 114.553,115.664 119,120.111 119,123.318 145.466,149.784 151.856,149.784 152.35,149.29 152.35,145.879 152.052,145.581 152.052,144.427 U1.72@152.05,144.425 ; F3.1@104.25,85.5 v1@104.25,91.75
  Top Layer w0.381: F3.1@104.2,85.45 F3.1@104.25,85.5 ; v1@104.25,91.75 v1(104.3,91.8)
  Bottom Layer w0.254: D23.3@97.439,91.761 v1@104.261,91.761 ; v1(99.6,106.3) 104.3,101.6 v1(104.3,91.8)
  Bottom Layer w0.381: D23.3@97.4,91.721 D23.3@97.439,91.761 ; v1@104.261,91.761 v1(104.3,91.8)
"SWDIO F": CN1.19 F3.2 P3.1 | length 72.8
  Top Layer w0.381: F3.2@104.2,83.75 104.2,82.4 119.2,67.4 148.976,67.4 155,73.424 CN1.19@155,73.5
  Bottom Layer w0.381: CN1.19@155,73.5 159.44,77.94 P3.1@159.44,83.5
"TC LED": R68.2 U1.24 | length 18.9
  Top Layer w0.254: U1.24@162.05,129.375 162.052,129.373 162.052,128.615 163.576,127.091 163.576,125.984 164.719,124.841 v1(164.846,124.841) ; v1(169.291,132.588) 170.369,132.588 R68.2@170.496,132.461
  Bottom Layer w0.254: v1(164.846,124.841) 164.923,124.918 165.621,124.918 166.116,125.413 166.116,130.175 166.497,130.556 166.497,132.588 166.751,132.842 168.893,132.842 169.147,132.588 v1(169.291,132.588)
"TC LED Output": CN1.23 IReg6.5 IReg6.6 IReg6.7 IReg6.8 | length 80.3
  Top Layer w0.508: v1(152.908,98.933) v1(152.908,109.22) ; v1(165.1,121.158) 165.176,121.158 165.381,121.363 IReg6.5@171.069,121.363 IReg6.6@172.339,121.363 IReg6.7@173.609,121.363 IReg6.8@174.879,121.363
  Bottom Layer w0.508: CN1.23@149,69.5 150.532,71.032 150.532,74.258 141.351,83.439 141.351,87.376 v1(152.908,98.933) ; v1(152.908,109.22) 152.908,116.713 157.353,121.158 v1(165.1,121.158)
"Traction Control": CN1.11 R36.1 R37.1 | length 42.9
  Top Layer w0.508: CN1.11@171,69.5 174.087,72.587 174.087,74.387 179.15,79.45 202.7,79.45 204.4,81.15 R36.1@204.4,83.2 R37.1@204.4,84.75
"Traction Control Interm": D22.2 R37.2 R38.1 | length 6.6
  Top Layer w0.254: D22.2@201.86,87.35 202.573,88.063 202.763,88.063 204.35,89.65 R38.1@204.35,89.7
  Top Layer w0.508: D22.2@201.86,87.35 201.87,87.35 203,86.22 R37.2@203,84.75
"TSA BTN": CN1.7 R25.1 R26.1 | length 51.9
  Top Layer w0.508: CN1.7@176,73.5 176,75.33 179.434,78.764 202.984,78.764 207.5,83.28 207.5,92.75 204.55,95.7 R25.1@204.55,95.75 R26.1@204.55,97.35
"TSA LED 1": R49.2 U1.4 | length 43.1
  Top Layer w0.254: U1.4@152.05,129.375 152.05,120.393 155.549,116.894 161.844,116.894 162.732,117.782 179.264,117.782 180.487,116.559 183.8,116.559 R49.2@183.8,116.509
"TSA LED 1 Output": CN1.13 IReg1.5 IReg1.6 IReg1.7 IReg1.8 | length 47.4
  Top Layer w0.508: CN1.13@166,73.5 168.782,76.282 168.782,81.282 173.368,85.868 179.868,85.868 182.25,88.25 182.25,98.669 184.595,101.014 IReg1.5@184.595,105.55 IReg1.6@185.865,105.55 IReg1.7@187.135,105.55 IReg1.8@188.405,105.55
"TSA LED 2": R55.2 U1.2 | length 33.3
  Top Layer w0.254: U1.2@151.05,129.375 151.05,120.171 155.191,116.03 162.202,116.03 163.071,116.9 172.4,116.9 R55.2@172.9,116.4
"TSA LED 2 Output": CN1.16 IReg3.5 IReg3.6 IReg3.7 IReg3.8 | length 41.5
  Top Layer w0.508: CN1.16@161,73.5 163.782,76.282 163.782,79.532 172.25,88 172.25,103.205 IReg3.5@174.595,105.55 IReg3.6@175.865,105.55 IReg3.7@177.135,105.55 IReg3.8@178.405,105.55
TSA_BTN_Interm: D14.2 R26.2 R27.1 | length 6.4
  Top Layer w0.254: D14.2@202.01,99.75 D14.2@202.02,99.75 ; R26.2@203.15,97.35 203.15,98.62 D14.2@202.02,99.75 ; R27.1@204.5,102.1 204.5,102.05 203.57,101.12 203.39,101.12 D14.2@202.02,99.75
"UC APPS 1": C21.2 D6.3 R17.2 R19.2 U1.15 | length 79.9
  Top Layer w0.254: U1.15@157.55,129.375 157.55,125.511 158.016,125.045 159.697,125.045 160.732,124.01 160.732,120.121 162.603,118.25 179.407,118.25 180.157,117.5 210.494,117.5 217.477,110.517 217.527,110.517 217.8,110.244 C21.2@217.8,110.194 R19.2@217.8,108.739 217.527,108.466 217.527,106.327 D6.3@217.5,106.3 217.773,106.027 217.773,103.323 R17.2@217.8,103.296
"UC APPS 2": C20.2 D5.3 R13.2 R15.2 U1.30 | length 65.6
  Top Layer w0.254: U1.30@164.075,132.9 164.077,132.898 164.999,132.898 165.014,132.883 165.481,133.35 191.65,133.35 201.05,123.95 213.05,123.95 214.033,122.967 217.577,122.967 217.85,122.694 C20.2@217.85,122.644 R15.2@217.85,121.189 217.577,120.916 217.577,118.777 D5.3@217.55,118.75 217.823,118.477 217.823,115.773 R13.2@217.85,115.746
"UC BPS": C26.2 D3.2 R60.2 U1.17 | length 65.2
  Top Layer w0.254: U1.17@158.55,129.375 158.55,128.2 157.982,127.632 157.982,125.69 158.195,125.477 159.876,125.477 161.163,124.189 161.163,120.3 162.782,118.682 179.585,118.682 180.335,117.932 195.482,117.932 v1(195.85,118.3) ; v1(195.9,116.65) C26.2@195.9,105.921 195.9,105.871 195.075,105.046 D3.2@195.075,104.167 195.373,103.869 195.969,103.869 197.55,102.287 R60.2@197.55,102.237
  Bottom Layer w0.254: v1(195.85,118.3) 195.875,118.275 195.875,116.675 v1(195.9,116.65)
"UC BT Rx": R32.2 U1.56 | length 56.6
  Top Layer w0.254: R32.2@116.016,136.582 116.073,136.525 127.093,136.525 143.374,152.806 155.626,152.806 160.05,148.382 U1.56@160.05,144.425
"UC BT Tx": R33.2 U1.55 | length 58.1
  Top Layer w0.254: R33.2@116.016,135.128 v1(124.46,135.128) ; v1(126.873,137.541) 126.975,137.643 127.6,137.643 143.196,153.238 155.804,153.238 160.55,148.493 U1.55@160.55,144.425
  Bottom Layer w0.254: v1(124.46,135.128) v1(126.873,137.541)
"UC Launch Btn": C31.2 D15.2 R35.2 U1.37 | length 69.3
  Top Layer w0.254: U1.37@164.075,136.4 188.4,136.4 190.885,133.915 191.018,134.048 v1(191.1,134.048) ; v1(191.1,132.1) 191.125,132.1 204.525,118.7 v1(204.55,118.7) ; v1(204.55,116.5) 204.55,112.15 C31.2@211.05,105.65 211.05,105.6 210.125,104.675 D15.2@210.125,103.8 211.1,102.825 R35.2@211.1,101.95
  Bottom Layer w0.254: v1(191.1,132.1) v1(191.1,134.048) ; v1(204.55,116.5) v1(204.55,118.7)
"UC RTD BTN": C27.2 D8.2 R24.2 U1.36 | length 82.3
  Top Layer w0.254: U1.36@164.075,135.9 187.5,135.9 189.485,133.915 189.618,134.048 v1(189.7,134.048) ; v1(189.949,132.349) 189.949,132.25 203.048,119.151 203.048,118.802 v1(203.15,118.7) ; v1(203.15,116.5) 203.15,112.85 208.1,107.9 208.1,95 209.6,93.5 C27.2@211.2,93.5 211.2,93.45 210.275,92.525 D8.2@210.275,91.704 210.573,91.406 211.244,91.406 212.65,90 R24.2@212.65,89.95
  Bottom Layer w0.254: v1(189.7,134.048) 189.7,132.404 189.894,132.404 v1(189.949,132.349) ; v1(203.15,116.5) v1(203.15,118.7)
"UC Shutdown Tap": C32.2 D16.2 R41.1 U1.87 | length 53
  Top Layer w0.254: R41.1@129.2,105.812 127.446,107.567 D16.2@126.825,107.567 126.825,108.346 C32.2@127.8,109.321 127.8,112.484 123.9,116.384 123.9,123.258 132.779,132.136 134.996,132.136 135.433,131.699 v1(137.795,131.699) ; v1(141.732,137.033) 141.876,137.033 142.243,137.4 U1.87@149.025,137.4
  Bottom Layer w0.254: v1(137.795,131.699) 137.731,131.762 137.731,133.032 v1(141.732,137.033)
"UC SW BTN": BT2.5 U1.60 | length 72.1
  Top Layer w0.254: BT2.5@94.869,144.993 96.023,144.993 97.512,146.482 115.697,146.482 116.916,147.701 123.19,147.701 124.841,146.05 v1(134.62,146.05) ; v1(139.573,146.177) 139.674,146.278 139.674,146.663 144.09,151.079 154.91,151.079 158.05,147.939 U1.60@158.05,144.425
  Bottom Layer w0.254: v1(134.62,146.05) 134.683,146.113 139.51,146.113 v1(139.573,146.177)
"UC SWCLK": D11.3 F7.1 U1.76 | length 97.6
  Top Layer w0.254: v1(102.25,114.25) 102.839,114.25 103.389,114.8 114.979,114.8 120.867,120.689 120.867,124.511 139.993,143.637 143.256,143.637 143.993,142.9 U1.76@149.025,142.9 ; F7.1@102.9,85.543 102.9,92.7 v1(102.9,95.8) 102.9,112 v1(104.1,113.2)
  Top Layer w0.381: F7.1@102.807,85.45 F7.1@102.9,85.543
  Bottom Layer w0.254: D11.3@97.445,95.755 v1@102.855,95.755 ; v1@102.328,114.172 103.128,114.172 v1(104.1,113.2)
  Bottom Layer w0.381: D11.3@97.4,95.711 D11.3@97.445,95.755 ; v1(102.25,114.25) v1@102.328,114.172 ; v1@102.855,95.755 v1(102.9,95.8)
"UC SWCLK F": CN1.18 F7.2 P3.4 | length 89.2
  Top Layer w0.381: F7.2@102.807,83.75 102.807,82.993 121.8,64 159.5,64 CN1.18@161,65.5 157,69.5 157,78.32 P3.4@151.82,83.5
"UC SWO": D10.3 F6.1 U1.89 | length 90.5
  Top Layer w0.254: F6.1@101.6,85.55 v1(101.6,99.6) 101.6,111.789 103.742,113.932 115.332,113.932 121.731,120.331 121.731,124.142 133.421,135.832 142.332,135.832 142.9,136.4 U1.89@149.025,136.4
  Top Layer w0.381: F6.1@101.5,85.45 F6.1@101.6,85.55
  Bottom Layer w0.254: D10.3@97.4,99.7 v1@101.5,99.7
  Bottom Layer w0.381: v1@101.5,99.7 v1(101.6,99.6)
"UC SWO F": CN1.15 F6.2 P3.3 | length 99.2
  Top Layer w0.381: F6.2@101.5,83.75 101.5,83.51 121.61,63.4 163.9,63.4 CN1.15@166,65.5 164.526,66.974 160.326,66.974 157.9,69.4 157.9,79.96 P3.3@154.36,83.5
"UC Traction Btn": C38.2 D20.2 R38.2 U1.34 | length 76.1
  Top Layer w0.254: U1.34@164.075,134.9 186.148,134.9 v1(187,134.048) ; v1(187,132.2) 187.144,132.2 187.595,131.75 188.036,131.75 188.341,131.445 189.103,131.445 200.45,120.098 v1(200.45,118.7) ; v1(200.45,116.6) 200.45,95.2 202.4,93.25 C38.2@203.15,93.25 203.15,92.279 D20.2@202.325,91.454 202.677,91.102 202.677,89.973 R38.2@202.95,89.7
  Bottom Layer w0.254: v1(187,132.2) v1(187,134.048) ; v1(200.45,116.6) v1(200.45,118.7)
"UC TSA BTN": C30.2 D13.2 R27.2 U1.35 | length 63.9
  Top Layer w0.254: U1.35@164.075,135.4 186.949,135.4 v1(188.3,134.048) ; v1(188.487,132.287) 188.513,132.261 189.049,132.261 201.8,119.51 v1(201.8,118.65) ; v1(201.85,116.55) 201.85,106.85 C30.2@203,105.7 203,105.65 202.125,104.775 D13.2@202.125,103.854 202.827,103.152 202.827,102.373 R27.2@203.1,102.1
  Bottom Layer w0.254: v1(188.3,134.048) 188.3,133.814 188.487,133.627 v1(188.487,132.287) ; v1(201.8,118.65) 201.825,118.625 201.825,116.575 v1(201.85,116.55)
"UC Vbatt": C33.2 D18.3 R44.2 R45.2 U1.32 | length 47
  Top Layer w0.254: U1.32@164.075,133.9 164.077,133.898 185.259,133.898 185.323,133.833 185.539,134.048 v1(185.674,134.048) ; v1(185.674,132.201) 186.557,131.318 187.517,131.318 C33.2@197.358,121.477 R45.2@195.834,121.477 195.784,121.477 195.357,121.904 D18.3@193.294,121.904 193.294,121.854 192.471,121.031 R44.2@190.565,121.031
  Bottom Layer w0.254: v1(185.674,132.201) v1(185.674,134.048)
Vbatt: C12.1 C13.2 C15.2 C16.1 C17.2 D2.K Q1.2 R22.2 R25.2 R31.2 R36.2 R43.1 R46.2 Ref1.4 REG1.1 REG2.1 | length 205.1
  Top Layer w0.381: R43.1@187.452,121.604 R46.2@185.928,121.604 185.978,121.604 186.187,121.814 186.187,122.179 187.12,123.112 187.374,123.112 v1(187.452,123.19) ; v1(213.3,116.25) 213.275,116.275 213.275,117.721 C15.2@213.25,117.746 213.267,117.763 213.267,118.767 213.6,119.1 Ref1.4@213.9,119.1
  Top Layer w0.508: v2(139.25,91.25) D2.K@144.025,91.25 ; v1(201.6,83.15) 201.65,83.2 R36.2@203,83.2 ; v1(201.6,95.75) R25.2@203.15,95.75 ; v1(209.9,95.8) 209.925,95.775 211.125,95.775 R31.2@211.15,95.75 ; v1(210.05,83.75) 210.075,83.775 211.325,83.775 R22.2@211.35,83.8
  Top Layer w1.016: Q1.2@143.8,87.85 143.8,91.025 D2.K@144.025,91.25 144.025,95.755 REG2.1@149.04,100.77 ; C16.1@149.04,108.29 REG2.1@149.04,100.77 ; REG1.1@165.608,99.06 165.608,92.092 C12.1@165.95,91.75 165.701,91.999 163.271,91.999 161.036,94.234 155.576,94.234 REG2.1@149.04,100.77
  Bottom Layer w0.381: v1(187.452,123.19) 207.691,123.19 209.169,121.712 209.169,117.983 210.902,116.25 v1(213.3,116.25) 209.9,112.85 v1(209.9,95.8)
  Bottom Layer w0.508: REG1.1@165.608,99.06 168.148,101.6 171.196,101.6 195.75,101.6 v1(201.6,95.75) ; v1(209.9,95.8) 209.875,95.775 201.625,95.775 v1(201.6,95.75) ; v1(210.05,83.75) 209.974,83.75 209.374,83.15 v1(201.6,83.15) v1(201.6,95.75)
  Bottom Layer w0.762: C17.2@148.05,109 148.05,101.76 REG2.1@149.04,100.77
  Bottom Layer w1.016: C13.2@164.25,93.25 165.612,94.611 165.612,99.056 REG1.1@165.608,99.06
Vcap1: C22.2 U1.48 | length 3.5
  Top Layer w0.254: U1.48@164.075,141.9 165.5,141.9 166.95,140.45 C22.2@166.95,140.4
Vcap2: C2.2 U1.73 | length 4.6
  Top Layer w0.254: C2.2@151.5,148.759 151.805,148.454 151.805,145.978 151.55,145.723 U1.73@151.55,144.425
"VCU Power": F8.2 Q1.3 | length 13.4
  Top Layer w1.016: v2(135.9,81.1) 140.2,81.1 144.558,85.458 144.742,85.458 144.75,85.466 Q1.3@144.75,85.65
  Bottom Layer w1.016: F8.2@135.763,83.522 F8.2@136,83.285 135.9,83.185 v2(135.9,81.1)
pads on no net: BT2.8 BT2.9 BT2.10 BT2.13 BT2.14 BT2.16 BT2.24 BT2.25 BT2.26 BT2.27 BT2.28 BT2.29 CN1.20 CN1.25 CN1.30 CN1.32 CN1.33 IReg1.2 IReg2.2 IReg3.2 IReg4.2 IReg5.2 IReg6.2 P1.1 Ref1.3 Ref1.5 U1.5 U1.7 U1.8 U1.9 U1.16 U1.18 U1.29 U1.31 U1.33 U1.38 U1.42 U1.44 U1.45 U1.46 U1.47 U1.51 U1.52 U1.53 U1.54 U1.63 U1.64 U1.65 U1.66 U1.67 U1.68 U1.69 U1.70 U1.71 U1.77 U1.80 U1.81 U1.82 U1.83 U1.84 U1.85 U1.86 U1.90 U1.93 U1.97 U1.98 U2.5 U2.8 U3.5 U3.8 U4.14
copper on no net: | length 3.9
  Top Layer w2.032: 93.095,83.66 94.365,83.66 95.635,83.66 ; 95.635,83.67 95.635,83.66 ; 96.905,83.66 95.635,83.66
  Bottom Layer w0.381: 130.683,71.038 130.728,70.993

## Polygon pours and split planes (outlines as drawn)
GND on Bottom Layer "Bottom Layer-GND" (solid, pour order 10): 82,150.453 87.547,156 176,156 204,128 222,128 228,122 228,82 219,73 210,73 210,64 206,60 104,60 100,64 100,73 91,73 82,82
GND on Top Layer "Top Layer-GND" (solid, pour order 8): 82,150.453 87.547,156 176,156 204,128 222,128 228,122 228,82 219,73 210,73 210,64 206,60 104,60 100,64 100,73 91,73 82,82

## Other copper
Top Layer:
  pour cut-out: 144,148 144,130 152,122 164,122 168.725,126.725 168.725,148
  pour cut-out: 90.932,146.685 90.932,147.955 93.472,147.955 93.472,146.685
Multi-Layer:
  pour cut-out: 107.315,151.384 103.251,151.384 103.251,148.463 107.315,148.463
  pour cut-out: 90.932,146.685 96.012,146.685 96.012,144.399 113.03,144.399 113.03,132.207 90.932,132.207
  pour cut-out: 93.98,156 107.315,156 107.315,151.384 93.98,151.384

## Silkscreen, mask and mechanical layers (free items; w line width, h text height)
Top Overlay:
  drawing of 6 lines, arcs and shapes, not listed
  text "ePBR25_VCB_rev0" at 131.7,153.1 h1.52
  text "#racecargofast" at 132.969,120.269 h0.76
  text "37" at 124,76 h0.79
  text "4" at 180.1,75.4 h0.79
  text "1" at 185.4,75.3 h0.79
  text "3v3" at 214.63,75.184 h1.52
  text "5v" at 199.898,72.517 h1.52
Bottom Overlay:
  drawing of 13 lines, arcs and shapes, not listed
Board Outline:
  lines w0.254: 82,150.495 82,82 91,73 100,73 100,64 104,60 206,60 210,64 210,73 219,73 228,82 228,122 222,128 204,128 176,156 87.547,156 82.042,150.495

## Text inside footprints (layer, text, board x,y; h text height)
BT2: Mechanical 1 "*" at 96.253,154.492 h0.79; Top Overlay "*" at 93.485,154.492 h0.79; Mechanical 16 "0.028in/0.711mm" at 97.32,131.171 h0.4; Mechanical 16 "0.059in/1.499mm" at 92.796,133.542 h0.4; Mechanical 16 "0.244in/6.2mm" at 92.261,150.293 h0.4; Mechanical 16 "0.043in/1.1mm" at 92.229,146.643 h0.4; Mechanical 16 "0.866in/21.996mm" at 109.114,144.292 h0.4
REG1: Mechanical 1 "*" at 168.275,99.06 h0.79 r180; Top Overlay "*" at 169.545,99.06 h0.79 r180